# Altium PCB EEM_FMC_Carrier.PcbDoc (part 8 of 19)
Units mm, origin at the board's own origin, x right, y up, seen from the top; angles counter-clockwise.
Board outline 222.9 x 100 mm, 6 copper layers (TopLayer, MidLayer1, MidLayer2, SignalLayer1, Internal Plane 1, BottomLayer), stack 1.528 mm thick; 790 components, 743 nets, 3570 pads, 2277 vias.
Unrouted connection lines stored in the file: 3.
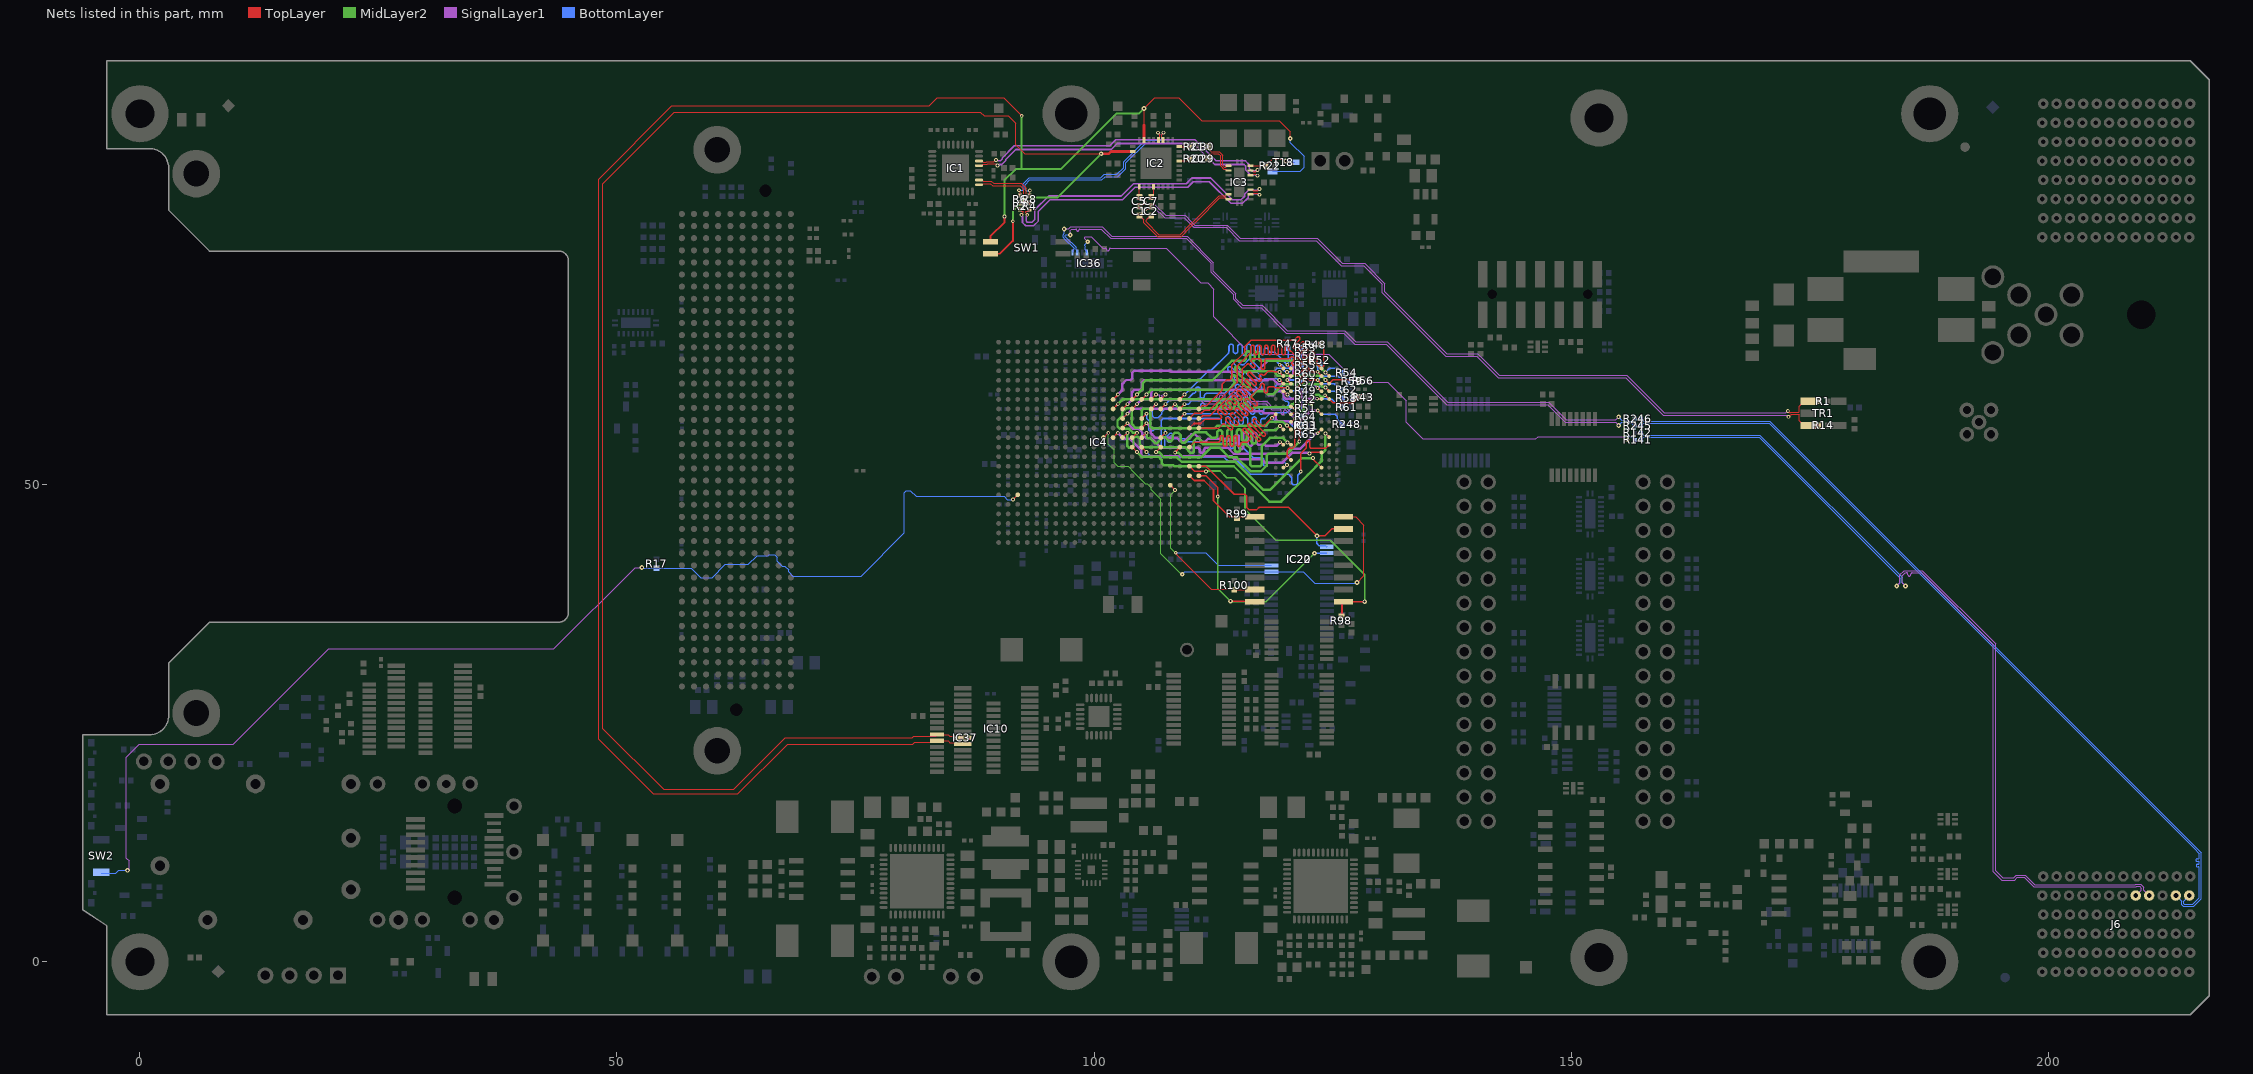
[diagram p10: the nets of this part, all layers, seen from the top]

## Via types
v1: diameter 0.4, hole 0.2, TopLayer to BottomLayer, tented both sides, 1032 vias
v2: diameter 0.5, hole 0.2, TopLayer to BottomLayer, tented both sides, 979 vias
v3: diameter 0.5, hole 0.2, TopLayer to BottomLayer, 162 vias
v4: diameter 0.8, hole 0.5, TopLayer to BottomLayer, tented both sides, 102 vias
v5: diameter 0.6, hole 0.3, TopLayer to BottomLayer, tented both sides, 2 vias

## Nets (pads, with @x,y where several pads share a name; then routed paths per layer and width w, separated by ;. In a path a pad name is that pad's centre, name@x,y a point inside that pad or via, vN(x,y) a via of type N, cw(c..) or ccw(c..) an arc to the next point about the centre after c; other vN are vias at no path point) (continued)
BP_MGT.Rx_P: IC36.15 R141.1 | length 72.5
  SignalLayer1 w0.11: v2(99.348,75.475) 99.31,75.475 99.016,75.768 99.016,75.937 99.081,76.002 99.172,76.002 99.174,76 99.7,76 100.875,74.825 100.912,74.788 101.19,74.788 cw(c101.19,74.658) 101.32,74.658 101.32,74.652 ccw(c101.45,74.652) 101.58,74.652 101.58,74.658 cw(c101.71,74.658) 101.71,74.788 101.948,74.788 107.577,74.788 111.202,71.163 111.902,71.163 112.55,70.515 112.55,67.59 116.452,63.688 124.627,63.688 127.552,60.763 130.775,60.763 132.738,58.8 132.738,56.537 134.45,54.825 146.31,54.825 146.542,55.057 155.557,55.057 v2(155.889,54.725)
  BottomLayer w0.085: IC36.15@99.248,74.35 99.248,74.525 99.166,74.607 99.154,74.607 99.104,74.657 99.104,74.969 99.004,75.069 99.004,75.14 99.34,75.475 v2(99.348,75.475) ; v2(155.889,54.725) 155.942,54.778 155.942,55.019 155.992,55.069 156.175,55.069 156.196,55.048 156.258,54.986 156.362,54.986 156.648,54.7 R141.1@156.668,54.7
BP_MGT.Tx_N: IC36.12 R246.1 | length 72.7
  SignalLayer1 w0.11: v2(96.873,76.825) 97.342,76.825 97.565,77.049 100.876,77.049 101.85,76.075 109.75,76.075 112.525,73.3 112.525,72.375 114.862,70.038 114.862,69.523 115.585,68.8 117.612,68.8 120.275,66.137 126.288,66.137 127.45,64.975 130.75,64.975 137.075,58.65 147.66,58.65 149.517,56.794 154.667,56.794 v2(154.998,57.125)
  BottomLayer w0.085: v2(96.873,76.825) 96.879,76.819 96.879,76.345 96.766,76.232 96.766,75.939 96.891,75.815 97.914,74.792 97.914,74.721 97.83,74.638 97.83,74.432 IC36.12@97.748,74.35 ; v2(154.998,57.125) 155.342,56.781 155.863,56.781 155.963,56.681 156.431,56.681 156.481,56.731 156.481,56.783 156.648,56.95 R246.1@156.668,56.95
BP_MGT.Tx_P: IC36.13 R245.1 | length 72.5
  SignalLayer1 w0.11: v2(97.509,76.189) 97.509,76.657 97.663,76.812 97.825,76.812 98.09,76.812 cw(c98.09,76.702) 98.2,76.702 98.2,76.681 ccw(c98.305,76.681) 98.305,76.576 ccw(c98.305,76.681) 98.41,76.681 98.41,76.702 cw(c98.52,76.702) 98.52,76.812 98.855,76.812 100.778,76.812 101.752,75.838 109.652,75.838 112.288,73.202 112.288,72.277 114.625,69.94 114.625,69.425 115.487,68.563 117.514,68.563 120.177,65.9 126.19,65.9 127.352,64.738 130.652,64.738 136.977,58.413 147.562,58.413 149.418,56.557 154.667,56.557 v2(154.998,56.225)
  BottomLayer w0.085: v2(97.509,76.189) 97.504,76.194 97.029,76.194 96.979,76.144 96.979,76.027 98.126,74.88 98.126,74.694 98.137,74.682 98.137,74.635 98.248,74.525 IC36.13@98.248,74.35 ; v2(154.998,56.225) 155.342,56.569 155.775,56.569 155.875,56.469 156.431,56.469 156.481,56.419 156.481,56.368 156.648,56.2 R245.1@156.668,56.2
BP_MGT_Rx_N: J6.E5 R142.2 | length 90.6
  SignalLayer1 w0.11: v2(185.048,39.4) 184.717,39.732 184.717,40.467 184.875,40.625 185.025,40.775 185.163,40.775 cw(c185.163,40.62) 185.318,40.62 185.318,40.586 ccw(c185.473,40.586) 185.473,40.431 ccw(c185.473,40.586) 185.628,40.586 185.628,40.62 cw(c185.783,40.62) 185.783,40.775 186.061,40.775 186.74,40.775 194.263,33.252 194.263,9.452 195.152,8.563 196.488,8.563 196.778,8.853 197.512,8.853 198.507,7.858 209.261,7.858 209.303,7.9 209.6,7.9 209.782,7.719 209.782,7.5 209.231,6.95 J6.E5@209.2,6.95
  BottomLayer w0.085: R142.2@157.328,55.45 157.348,55.45 157.515,55.283 157.515,55.231 157.565,55.181 157.699,55.181 157.705,55.187 ; 157.6,55.187 157.705,55.187 ; v2(185.048,39.4) 184.704,39.744 184.704,40.288 169.805,55.187 157.705,55.187
BP_MGT_Rx_P: J6.D5 R141.2 | length 90.7
  SignalLayer1 w0.11: v2(184.148,39.4) 184.48,39.731 184.48,40.565 184.927,41.012 186.061,41.012 186.838,41.012 194.5,33.35 194.5,9.55 195.25,8.8 196.39,8.8 196.68,9.09 197.61,9.09 198.605,8.095 209.163,8.095 209.205,8.137 209.698,8.137 210.019,7.817 210.019,7.5 210.569,6.95 J6.D5@210.6,6.95
  BottomLayer w0.085: R141.2@157.328,54.7 157.348,54.7 157.515,54.868 157.515,54.919 157.565,54.969 157.787,54.969 157.793,54.975 ; 157.6,54.975 157.793,54.975 ; v2(184.148,39.4) 184.492,39.744 184.492,40.2 169.717,54.975 157.793,54.975
BP_MGT_Tx_N: J6.B5 R246.2 | length 86.2
  BottomLayer w0.085: R246.2@157.328,56.95 157.348,56.95 157.515,56.783 157.515,56.725 157.565,56.675 170.85,56.675 216.087,11.438 216.087,6.612 215.275,5.8 214.187,5.8 213.994,5.993 213.994,6.356 J6.B5@213.4,6.95
BP_MGT_Tx_P: J6.A5 R245.2 | length 86.1
  BottomLayer w0.085: R245.2@157.328,56.2 157.348,56.2 157.515,56.368 157.515,56.413 157.565,56.463 170.762,56.463 194.688,32.538 213.45,13.775 215.286,11.939 ; J6.A5@214.8,6.95 214.206,6.356 214.206,6.081 214.275,6.012 215.187,6.012 215.875,6.7 215.875,9.59 215.875,9.805 ccw(c215.733,9.805) 215.733,9.947 215.677,9.947 cw(c215.677,10.09) 215.534,10.09 cw(c215.677,10.09) 215.677,10.232 215.733,10.232 ccw(c215.733,10.375) 215.875,10.375 ccw(c215.733,10.375) 215.733,10.517 215.631,10.517 cw(c215.631,10.66) 215.488,10.66 cw(c215.631,10.66) 215.631,10.802 215.733,10.802 ccw(c215.733,10.945) 215.875,10.945 215.875,11.272 215.875,11.35 215.288,11.938
BUTTON: IC4.U3 R17.1 SW2.1 | length 126
  TopLayer w0.127: v1(91.498,48.45) IC4.U3@91.998,48.95
  SignalLayer1 w0.1: v2(-1.296,9.589) -1.15,9.735 -1.15,10.575 -1.425,10.85 -1.425,21.45 -0.075,22.8 9.775,22.8 19.787,32.812 43.388,32.812 51.9,41.325 v2(52.6,41.325)
  BottomLayer w0.1: v2(52.6,41.325) 52.666,41.259 57.791,41.259 58.775,40.275 59.975,40.275 61.35,41.65 63.775,41.65 64.714,42.589 65.839,42.589 65.925,42.675 66.525,42.675 66.8,42.4 66.8,42 67.325,41.475 67.593,41.475 67.987,41.081 67.987,40.888 68.436,40.439 75.589,40.439 80.1,44.95 80.1,49.168 80.307,49.375 80.75,49.375 81.35,48.775 90.575,48.775 90.9,48.45 v1(91.498,48.45)
  BottomLayer w0.127: SW2.1@-4.05,9.275 -2.53,9.275 -2.216,9.589 v2@-1.289,9.589
CFG_CCLK: IC4.L12 IC20.9 IC22.16 | length 47.4
  TopLayer w0.1: IC22.16@126.148,46.645 127.435,46.645 128.3,45.78 128.3,40.475 v2(127.575,39.75)
  TopLayer w0.125: IC4.L12@100.998,54.95 v1(101.498,55.45)
  MidLayer2 w0.1: v1(101.498,55.45) 101.498,54.25 102.098,53.65 102.098,52.329 102.498,51.929 103.569,51.929 104.172,51.326 104.172,51.315 105.392,50.094 105.579,50.094 106,49.673 106,49.487 106.998,48.489 106.998,42.75 109.123,40.625 v2(109.248,40.625)
  BottomLayer w0.1: v2(109.248,40.625) 109.523,40.9 IC20.9@118.598,40.9 121.925,40.9 123.125,39.7 127.525,39.7 v2(127.575,39.75)
CFG_D02: IC4.P21 IC22.9 R98.1 | length 30.9
  TopLayer w0.167: IC4.P21@109.998,51.95 110.548,51.4 v1(111.723,51.4) ; R98.1@125.998,36.17 IC22.9@125.998,37.605 ; IC22.9@126.148,37.755 127.581,37.755 ; 127.586,37.761 v2@128.362,37.761
  MidLayer2 w0.167: v1(111.723,51.4) 111.768,51.445 113.203,51.445 113.917,50.731 114.747,50.731 115.825,49.653 115.825,47.425 118.05,45.2 ; 118.049,45.199 119.073,44.175 124.773,44.175 128.373,40.575 v2(128.373,37.75)
CFG_D03: IC4.R21 IC22.1 R99.1 | length 9.3
  TopLayer w0.167: IC4.R21@109.998,50.95 110.498,50.45 111.525,50.45 112.523,49.452 112.523,48.325 112.998,47.85 114.203,46.645 114.998,46.645 IC22.1@116.848,46.645
CFG_DIN_D1: IC4.R22 IC20.3 IC22.8 | length 29.8
  TopLayer w0.167: IC4.R22@110.998,50.95 111.748,50.95 112.498,50.2 112.973,49.725 v1@112.973,48.8 ; v2(114.3,37.8) 114.325,37.775 116.828,37.775 IC22.8@116.848,37.755
  MidLayer2 w0.167: v1(112.973,48.788) 112.973,47.85 112.973,39.122 114.295,37.8 v2(114.3,37.8) 114.364,37.736 114.558,37.736 114.564,37.73 118.028,37.73 v2(123.123,42.825)
  BottomLayer w0.167: v2(123.123,42.825) 124.373,42.825 IC20.3@124.398,42.85
CFG_FCS: IC4.T19 IC20.10 IC22.7 R100.1 | length 28.2
  TopLayer w0.125: IC4.T19@107.998,49.95 v1(108.498,49.45) ; v1(108.573,42.875) 108.573,42.801 108.672,42.702 108.672,42.676 112.298,39.05 114.696,39.05 R100.1@114.698,39.052 ; R100.1@114.698,38.98 114.743,39.025 IC22.7@116.848,39.025
  MidLayer2 w0.125: v1(108.498,49.45) 108.023,48.975 108.023,43.376 108.524,42.875 v1(108.573,42.875)
  BottomLayer w0.125: v1(108.573,42.875) 111.723,42.875 113.048,41.55 IC20.10@118.598,41.55
CFG_MOSI_D0: IC4.P22 IC20.2 IC22.15 | length 21.4
  TopLayer w0.16: IC4.P22@110.998,51.95 111.748,51.95 114.698,49 115.822,49 116.006,48.816 116.006,47.62 116.223,47.403 117.072,47.403 117.32,47.65 120.373,47.65 v2(123.373,44.65) 124.2,44.65 124.925,45.375 IC22.15@126.148,45.375
  BottomLayer w0.167: v2(123.373,44.65) 123.348,44.625 123.348,43.873 123.623,43.598 124.3,43.598 IC20.2@124.398,43.5
CK_MMCX_ALT_N: C2.2 IC3.18 | length 11.9
  TopLayer w0.085: C2.2@105.998,78.25 105.731,77.983 105.683,77.983 105.45,77.75 105.45,77.55 106.763,76.237 109.043,76.237 110.198,77.392 110.556,77.75 113.112,80.306 113.791,80.306 113.841,80.356 113.841,80.368 113.923,80.45 IC3.18@114.098,80.45
CK_MMCX_ALT_P: C1.2 IC3.19 | length 12.2
  TopLayer w0.085: C1.2@104.748,78.25 105.238,77.76 105.238,77.462 105.425,77.275 106.675,76.025 109.131,76.025 110.198,77.092 110.856,77.75 113.2,80.094 113.791,80.094 113.841,80.044 113.841,80.033 113.923,79.95 IC3.19@114.098,79.95
CK_MMCX_IN_N: C2.1 C7.1 R14.2 TR1.1 | length 81.9
  TopLayer w0.085: v1(105.399,78.924) 105.681,78.924 105.731,78.974 105.731,78.983 105.898,79.15 C2.1@105.998,79.15 ; v1(172.808,57.128) 172.819,57.128 173.01,57.319 173.084,57.319 173.14,57.375 173.633,57.375 173.865,57.375 173.915,57.325 173.915,56.738 174.426,56.227 TR1.1@174.871,56.227 175.986,56.227 R14.2@175.991,56.222
  SignalLayer1 w0.11: v1(105.399,78.924) 105.414,78.924 105.609,79.118 106.285,79.118 107.404,78 109.44,78 110.198,77.242 110.449,76.991 113.849,76.991 115.24,75.6 123.315,75.6 125.94,72.975 128.263,72.975 130.238,71 130.238,70.114 136.877,63.475 140.115,63.475 142.365,61.225 155.74,61.225 159.658,57.307 172.599,57.307 172.777,57.128 v1(172.808,57.128)
CK_MMCX_IN_P: C1.1 C5.1 R1.2 TR1.3 | length 82.1
  TopLayer w0.085: C1.1@104.748,79.15 104.748,79.209 105.015,79.477 105.214,79.477 105.288,79.55 v1(105.373,79.55) ; v1(172.724,57.722) 172.735,57.722 172.926,57.531 172.996,57.531 173.052,57.587 173.546,57.587 173.865,57.587 173.915,57.637 173.915,58.255 174.426,58.767 TR1.3@174.871,58.767 174.876,58.762 R1.2@175.991,58.762
  SignalLayer1 w0.11: v1(105.373,79.55) 105.388,79.55 105.582,79.355 106.383,79.355 107.502,78.237 109.538,78.237 110.198,77.577 110.547,77.228 113.947,77.228 115.338,75.837 123.413,75.837 126.038,73.212 128.361,73.212 130.475,71.098 130.475,70.212 136.975,63.712 140.213,63.712 142.463,61.462 155.838,61.462 159.756,57.544 172.515,57.544 172.693,57.722 v1(172.724,57.722)
CK_MMCX_N: C7.2 IC2.28 | length 1.2
  TopLayer w0.085: C7.2@105.998,80.15 106.248,80.4 IC2.28@106.248,81.25
CK_MMCX_P: C5.2 IC2.25 | length 1.1
  TopLayer w0.085: C5.2@104.748,80.15 IC2.25@104.748,81.25
CK_MUX_OUT0_N: IC1.2 R4.2 R8.2 | length 7.1
  TopLayer w0.1: IC1.2@87.948,81.95 88.257,81.95 88.382,81.825 89.254,81.825 89.479,81.6 92.379,81.6 92.88,81.099 92.88,79.769 92.938,79.71 93.088,79.71 93.248,79.55 R4.2@93.248,79.53
CK_MUX_OUT0_P: IC1.1 R2.2 R6.2 | length 6.7
  TopLayer w0.1: IC1.1@87.948,81.45 88.257,81.45 88.382,81.575 89.15,81.575 89.375,81.35 92.275,81.35 92.5,81.125 92.63,80.995 92.63,79.769 92.571,79.71 92.408,79.71 92.248,79.55 R2.2@92.248,79.53
CK_OSC_ALT_N: C30.2 IC3.12 | length 3.8
  TopLayer w0.085: C30.2@111.948,85.45 112.215,85.183 112.215,84.981 112.265,84.931 113.107,84.931 113.475,84.563 113.475,83.506 113.675,83.306 113.791,83.306 113.841,83.356 113.841,83.368 113.923,83.45 IC3.12@114.098,83.45
CK_OSC_ALT_P: C29.2 IC3.13 | length 3.8
  TopLayer w0.085: C29.2@111.948,84.2 112.215,84.467 112.215,84.669 112.265,84.719 113.019,84.719 113.263,84.475 113.263,83.418 113.587,83.094 113.791,83.094 113.841,83.044 113.841,83.033 113.923,82.95 IC3.13@114.098,82.95
CK_OSC_N: IC2.8 R21.2 | length 1.1
  TopLayer w0.09: IC2.8@108.948,85.45 R21.2@110.028,85.45
CK_OSC_P: IC2.5 R20.2 | length 1.2
  TopLayer w0.09: IC2.5@108.948,83.95 109.783,83.95 110.028,84.195 R20.2@110.028,84.197
CLK_MUX_ALT_OUT0_N: IC3.4 R4.1 | length 31.2
  TopLayer w0.1: v1(92.998,78.3) 92.998,78.369 92.859,78.509 92.859,78.631 92.917,78.69 93.088,78.69 93.248,78.85 R4.1@93.248,78.87 ; IC3.4@116.398,80.95 116.573,80.95 116.698,80.825 117.139,80.825 117.314,81 v1(117.348,81)
  SignalLayer1 w0.17: v1(92.998,78.3) 92.998,78.238 92.888,78.128 92.888,77.642 93.005,77.525 93.5,77.525 93.795,77.82 93.795,78.82 95.25,80.275 102.863,80.275 104.143,81.555 109.655,81.555 110.255,82.155 112.245,82.155 114.52,79.88 115.418,79.88 115.795,80.257 115.795,80.482 116.203,80.89 117.176,80.89 117.286,81 v1(117.348,81)
CLK_MUX_ALT_OUT0_P: IC3.3 R2.1 | length 31.9
  TopLayer w0.1: R2.1@92.248,78.87 92.248,78.85 92.408,78.69 92.55,78.69 92.609,78.631 92.609,78.501 92.408,78.3 v1(92.398,78.3) ; IC3.3@116.398,80.45 116.573,80.45 116.698,80.575 117.139,80.575 117.314,80.4 v1(117.348,80.4)
  SignalLayer1 w0.17: v1(92.398,78.3) 92.398,78.238 92.508,78.128 92.508,77.484 92.847,77.145 93.657,77.145 94.175,77.663 94.175,78.663 95.407,79.895 103.02,79.895 104.3,81.175 109.812,81.175 110.412,81.775 112.088,81.775 114.363,79.5 115.575,79.5 116.175,80.1 116.175,80.325 116.36,80.51 117.176,80.51 117.286,80.4 v1(117.348,80.4)
CLK_MUX_ALT_OUT1_N: IC1.6 IC3.8 | length 32.9
  TopLayer w0.1: IC1.6@87.948,83.95 88.257,83.95 88.382,83.825 88.7,83.825 88.755,83.88 89.514,83.88 89.684,84.05 v1(89.723,84.05) ; IC3.8@116.398,82.95 116.573,82.95 116.698,82.825 116.939,82.825 117.114,83 v1(117.148,83)
  SignalLayer1 w0.17: v1(89.723,84.05) 89.785,84.05 89.884,83.952 90.178,83.952 90.372,84.146 90.372,84.26 91.638,85.525 101.638,85.525 102.268,86.155 110.595,86.155 112.8,83.95 115.875,83.95 116.275,83.55 116.275,83.162 116.547,82.89 116.976,82.89 117.086,83 v1(117.148,83)
CLK_MUX_ALT_OUT1_P: IC1.5 IC3.7 | length 32.9
  TopLayer w0.1: IC1.5@87.948,83.45 88.257,83.45 88.382,83.575 88.803,83.575 88.859,83.63 89.691,83.63 89.845,83.477 v1(89.899,83.477) ; IC3.7@116.398,82.45 116.573,82.45 116.698,82.575 116.939,82.575 117.114,82.4 v1(117.148,82.4)
  SignalLayer1 w0.17: v1(89.899,83.477) 89.962,83.477 90.057,83.572 90.335,83.572 90.752,83.988 90.752,84.102 91.795,85.145 101.795,85.145 102.425,85.775 110.438,85.775 112.643,83.57 115.718,83.57 115.895,83.393 115.895,83.005 116.39,82.51 116.976,82.51 117.086,82.4 v1(117.148,82.4)
CLK_MUX_OUT0_N: IC2.11 R8.1 | length 19.9
  TopLayer w0.1: R8.1@93.248,80.28 93.248,80.819 v1(93.273,80.844) ; IC2.11@107.248,86.15 107.248,86.3 107.123,86.425 107.123,86.699 107.298,86.874 v1(107.298,86.908)
  BottomLayer w0.1: v1(93.273,80.844) 92.886,80.844 92.812,80.918 92.812,81.475 93.287,81.95 100.825,81.95 101.175,82.3 102.5,82.3 103.327,83.127 103.327,83.75 105.452,85.875 106.696,85.875 107.112,86.29 107.112,86.699 107.298,86.886 v1(107.298,86.908)
CLK_MUX_OUT0_P: IC2.12 R6.1 | length 19.9
  TopLayer w0.1: v1(92.123,80.875) 92.123,80.795 92.248,80.671 R6.1@92.248,80.28 ; v1(106.698,86.908) 106.698,86.874 106.873,86.699 106.873,86.425 106.748,86.3 IC2.12@106.748,86.15
  BottomLayer w0.1: v1(92.123,80.875) 92.139,80.859 92.526,80.859 92.585,80.918 92.585,81.569 93.192,82.177 100.731,82.177 101.081,82.527 102.406,82.527 103.1,83.221 103.1,83.844 105.358,86.102 106.602,86.102 106.885,86.385 106.885,86.699 106.698,86.886 v1(106.698,86.908)
CLK_SEL0: IC2.15 IC10.24 IC37.7 SW1.1 T18.1 | length 209.1
  TopLayer w0.125: IC10.24@86.248,22.825 85.9,22.825 85.738,22.988 84.893,22.988 84.705,23.175 IC37.7@83.55,23.175 83.388,23.013 81.188,23.013 81,22.825 67.898,22.825 62.673,17.6 53.8,17.6 48.075,23.325 48.075,82.046 55.754,89.725 82.748,89.725 83.573,90.55 90.55,90.55 v1(92.425,88.675) ; 105.248,87.73 v2(105.248,89.45) 106.374,90.576 108.872,90.576 111.273,88.175 119.398,88.175 120.573,87 v2(120.573,86.3)
  TopLayer w0.203: SW1.1@89.139,75.489 89.139,76.032 90.627,77.521 v1(90.627,78.13)
  TopLayer w0.3: IC2.15@105.248,86.15 105.248,86.3 105.248,87.73
  MidLayer2 w0.203: v1(90.627,78.13) 90.602,78.156 90.602,81.902 91.825,83.125 92.4,83.125 ; v1(92.425,88.675) 92.4,88.65 92.4,83.125 ; v2(105.248,89.45) 104.698,88.9 102.34,88.9 96.565,83.125 92.4,83.125
  BottomLayer w0.125: T18.1@118.723,82.85 121.598,82.85 122.023,83.275 122.023,84.425 120.573,85.875 v2(120.573,86.3)
CLK_SEL0_N: IC3.9 R22.1 T18.3 | length 5.1
  TopLayer w0.125: IC3.9@116.398,83.45 R22.1@118.003,83.45 118.678,84.125 119.812,84.125 119.987,83.95 v2(120.073,83.95)
  BottomLayer w0.125: v2(120.073,83.95) 120.123,84 120.623,84 120.823,83.8 T18.3@121.023,83.8
CLK_SEL1: IC2.18 IC10.23 IC37.6 SW1.2 | length 179.6
  TopLayer w0.125: IC10.23@86.248,23.475 86.05,23.475 85.888,23.638 84.893,23.638 84.705,23.825 IC37.6@83.55,23.825 83.388,23.663 81.112,23.663 80.925,23.475 67.629,23.475 62.229,18.075 54.9,18.075 48.525,24.45 48.525,81.577 56.023,89.075 88.098,89.075 88.473,88.7 90.998,88.7 91.823,87.875 91.823,85.625 92.748,84.7 v2(100.748,84.7)
  TopLayer w0.203: SW1.2@89.139,74.219 90.145,74.219 91.491,75.565 v1(91.491,77.622)
  TopLayer w0.3: v2(100.748,84.7) 101.528,84.7 ; 101.571,84.732 101.789,84.95 IC2.18@104.048,84.95
  MidLayer2 w0.203: v1(91.491,77.622) 91.516,77.648 91.516,78.725 92.891,80.1 96.148,80.1 v2(100.748,84.7)
DDR3_A0: IC4.H14 IC11.N3 R62.1 | length 26.5
  TopLayer w0.16: IC4.H14@102.998,57.95 v1(103.498,58.45) ; v1(123.444,60.138) 123.477,60.138 123.815,59.8 IC11.N3@123.848,59.8
  SignalLayer1 w0.26: v1(103.498,58.45) 103.962,58.914 103.962,59.69 104.216,59.944 104.847,59.944 105.004,60.101 105.004,60.706 105.232,60.935 118.186,60.935 118.313,61.062 118.77,61.062 119.278,60.554 120.121,60.554 120.125,60.557 123.025,60.557 v1(123.444,60.138)
  BottomLayer w0.16: v1(123.444,60.138) 123.507,60.138 123.653,60.283 123.656,60.283 123.973,60.6 125.176,60.6 125.617,60.159 125.821,60.159 126.028,59.952 R62.1@126.028,59.95
DDR3_A1: IC4.G13 IC11.P7 R60.1 | length 25.9
  TopLayer w0.16: IC4.G13@101.998,58.95 v1(102.498,59.45) ; v1@120.263,60.985 IC11.P7@120.648,60.6
  SignalLayer1 w0.26: v1(102.498,59.45) 102.972,59.924 102.972,60.579 103.378,60.985 103.856,60.985 104.013,61.142 104.013,61.773 104.216,61.976 107.987,61.976 108.097,61.865 117.059,61.865 118.288,63.094 120.447,63.094 120.904,62.636 120.904,61.638 v1@120.269,61.003
  BottomLayer w0.16: v1(120.251,60.985) 121.083,60.985 121.728,61.63 R60.1@121.728,61.65
DDR3_A2: IC4.J22 IC11.P3 R59.1 | length 30.5
  TopLayer w0.16: IC4.J22@110.998,56.95 111.09,56.95 111.39,57.25 112.15,57.25 115.525,60.625 115.525,62.125 115.712,62.312 116.024,62.624 cw(c116.151,62.496) 116.278,62.624 116.575,62.326 ccw(c116.703,62.454) 116.83,62.326 ccw(c116.703,62.454) 116.83,62.581 116.533,62.878 cw(c116.66,63.005) 116.533,63.133 116.6,63.2 116.875,63.2 116.925,63.2 117.365,63.2 cw(c117.365,63.02) 117.545,63.02 117.545,62.262 ccw(c117.725,62.262) 117.905,62.262 117.905,63.02 cw(c118.085,63.02) 118.085,63.2 118.55,63.2 120.177,63.2 120.29,63.2 ccw(c120.29,63.593) 120.568,63.315 120.622,63.369 cw(c120.784,63.206) 120.947,63.369 cw(c120.784,63.206) 120.947,63.043 120.799,62.896 ccw(c120.962,62.733) 120.799,62.57 ccw(c120.962,62.733) 121.125,62.57 121.272,62.718 cw(c121.435,62.555) 121.598,62.718 cw(c121.435,62.555) 121.598,62.393 121.05,61.845 ccw(c121.212,61.682) 121.05,61.52 ccw(c121.212,61.682) 121.375,61.52 121.923,62.068 cw(c122.085,61.905) 122.248,62.068 cw(c122.085,61.905) 122.248,61.742 121.18,60.674 ccw(c121.342,60.511) 121.18,60.348 ccw(c121.342,60.511) 121.505,60.348 122.203,61.047 cw(c122.366,60.884) 122.528,61.047 122.59,60.985 123.414,60.985 v1(123.451,60.985) 123.457,60.985 123.842,60.6 IC11.P3@123.848,60.6
  BottomLayer w0.16: v1(123.451,60.985) 123.841,61.375 125.559,61.375 125.667,61.268 126.16,61.268 126.351,61.077 126.371,61.077 126.578,60.87 R59.1@126.578,60.85
DDR3_A3: IC4.H13 IC11.N2 R58.1 | length 26.6
  TopLayer w0.16: IC4.H13@101.998,57.95 v1(102.498,58.45) ; v1(124.251,60.185) 124.263,60.185 IC11.N2@124.648,59.8
  MidLayer2 w0.26: v1(102.498,58.45) 103.023,58.975 116.193,58.975 117.028,59.81 117.903,59.81 118.236,59.477 118.761,59.477 119.837,60.554 120.121,60.554 120.125,60.557 120.464,60.557 120.468,60.554 123.649,60.554 123.903,60.3 124.101,60.3 124.216,60.185 v1(124.251,60.185)
  BottomLayer w0.16: v1(124.251,60.185) 124.637,59.8 125.278,59.8 125.801,59.277 125.821,59.277 126.028,59.07 R58.1@126.028,59.05
DDR3_A4: IC4.H17 IC11.P8 R57.1 | length 25.6
  TopLayer w0.16: IC4.H17@105.998,57.95 v1(106.498,58.45) ; v1@119.463,60.985 IC11.P8@119.848,60.6
  BottomLayer w0.16: v1(106.498,58.45) 106.098,58.05 106.098,57.25 106.298,57.05 106.723,57.05 107.123,57.45 107.123,57.625 107.498,58 110.302,58 110.94,58 ccw(c110.94,58.23) 111.17,58.23 111.17,58.318 cw(c111.4,58.318) 111.63,58.318 111.63,58.23 ccw(c111.86,58.23) 111.86,58 112.4,58 114.327,58 114.398,58 115.008,58.61 ccw(c114.846,58.773) 115.008,58.936 114.987,58.957 cw(c115.15,59.12) 114.987,59.282 cw(c115.15,59.12) 115.312,59.282 115.522,59.072 ccw(c115.685,59.235) 115.847,59.072 ccw(c115.685,59.235) 115.847,59.398 115.637,59.608 cw(c115.8,59.77) 115.637,59.933 cw(c115.8,59.77) 115.963,59.933 116.423,59.472 ccw(c116.586,59.635) 116.749,59.472 ccw(c116.586,59.635) 116.749,59.798 116.288,60.258 cw(c116.451,60.421) 116.288,60.583 cw(c116.451,60.421) 116.613,60.583 117.189,60.007 ccw(c117.352,60.17) 117.515,60.007 ccw(c117.352,60.17) 117.515,60.333 117.51,60.337 cw(c117.673,60.5) 117.51,60.662 117.567,60.719 117.701,60.853 117.701,60.946 117.867,61.112 118.434,61.112 118.444,61.103 119.19,61.103 119.262,61.03 119.407,61.03 v1(119.451,60.985) 119.869,60.567 121.545,60.567 R57.1@121.728,60.75
DDR3_A5: IC4.G16 IC11.P2 R56.1 | length 30.3
  TopLayer w0.16: IC4.G16@104.998,58.95 v1(105.498,59.45) ; v1@124.263,60.985 IC11.P2@124.648,60.6 125.059,61.011 127.617,61.011 R56.1@127.728,60.9
  MidLayer2 w0.26: v1(105.498,59.45) 105.998,59.95 114.073,59.95 114.561,60.438 114.653,60.53 ccw(c114.47,60.714) 114.653,60.898 114.462,61.09 cw(c114.625,61.252) 114.462,61.415 cw(c114.625,61.252) 114.787,61.415 ; 114.787,61.415 115.931,60.271 ccw(c116.093,60.434) 116.256,60.271 ccw(c116.093,60.434) 116.256,60.597 114.851,62.002 cw(c115.013,62.164) 114.851,62.327 cw(c115.013,62.164) 115.176,62.327 115.629,61.874 ccw(c115.813,62.058) 115.997,61.874 116.008,61.885 116.565,61.885 117.157,61.885 117.182,61.91 118.811,61.91 119.066,61.654 119.066,61.634 119.286,61.414 123.872,61.414 124.185,61.101 124.185,61.087 124.251,61.021 v1(124.251,60.985)
DDR3_A6: IC4.K21 IC11.R8 R55.1 | length 30.2
  TopLayer w0.16: IC4.K21@109.998,55.95 110.473,56.425 111.175,56.425 111.625,56.875 113.038,56.875 113.225,56.875 113.316,56.966 ccw(c113.188,57.093) 113.316,57.22 113.021,57.515 cw(c113.148,57.642) 113.021,57.769 cw(c113.148,57.642) 113.276,57.769 113.645,57.4 ccw(c113.772,57.527) 113.899,57.4 ccw(c113.772,57.527) 113.899,57.654 113.53,58.024 cw(c113.657,58.151) 113.53,58.278 cw(c113.657,58.151) 113.785,58.278 114.154,57.909 ccw(c114.281,58.036) 114.409,57.909 ccw(c114.281,58.036) 114.409,58.163 114.039,58.533 cw(c114.167,58.66) 114.039,58.787 cw(c114.167,58.66) 114.294,58.787 114.663,58.418 ccw(c114.79,58.545) 114.918,58.418 ccw(c114.79,58.545) 114.918,58.673 ; 114.918,58.673 114.548,59.042 cw(c114.676,59.169) 114.548,59.296 cw(c114.676,59.169) 114.803,59.296 115.172,58.927 ccw(c115.3,59.054) 115.427,58.927 ccw(c115.3,59.054) 115.427,59.182 115.058,59.551 cw(c115.185,59.678) 115.058,59.806 cw(c115.185,59.678) 115.312,59.806 115.723,59.395 ccw(c115.85,59.522) 115.977,59.395 ccw(c115.85,59.522) 115.977,59.65 115.567,60.06 cw(c115.694,60.187) 115.567,60.315 cw(c115.694,60.187) 115.821,60.315 116.232,59.904 ccw(c116.359,60.031) 116.486,59.904 ccw(c116.359,60.031) 116.486,60.159 115.901,60.744 cw(c116.028,60.871) 115.901,60.998 cw(c116.028,60.871) 116.156,60.998 116.709,60.445 ccw(c116.837,60.572) 116.964,60.445 ccw(c116.837,60.572) 116.964,60.699 116.168,61.495 cw(c116.295,61.622) 116.168,61.75 cw(c116.295,61.622) 116.423,61.75 117.25,60.922 ccw(c117.377,61.05) 117.505,60.922 ccw(c117.377,61.05) 117.505,61.177 117.386,61.296 cw(c117.513,61.423) 117.386,61.55 cw(c117.513,61.423) 117.64,61.55 117.643,61.548 ccw(c117.77,61.675) 117.898,61.548 118.275,61.925 118.334,61.925 118.776,61.925 118.87,61.831 119.449,61.831 v1(119.456,61.824) 119.456,61.808 119.848,61.416 IC11.R8@119.848,61.4
  BottomLayer w0.16: R55.1@121.728,62.53 120.611,61.413 119.867,61.413 ; 119.867,61.413 119.824,61.413 119.456,61.781 v1(119.456,61.824) 119.867,61.413
DDR3_A7: IC4.G15 IC11.R2 R54.1 | length 28.6
  TopLayer w0.16: IC4.G15@103.998,58.95 v1(104.498,59.45) ; v1(124.251,61.785) 124.263,61.785 IC11.R2@124.648,61.4
  MidLayer2 w0.26: v1(104.498,59.45) 105.088,60.04 105.088,60.62 105.418,60.95 112.398,60.95 114.443,62.995 115.525,62.995 115.655,62.995 ccw(c115.655,63.255) 115.915,63.255 115.915,63.772 cw(c116.145,63.772) 116.375,63.772 116.375,63.214 ccw(c116.605,63.214) 116.835,63.214 116.835,63.702 cw(c117.065,63.702) 117.295,63.702 117.295,63.255 ccw(c117.555,63.255) 117.555,62.995 118.008,62.995 123.041,62.995 v1(124.251,61.785)
  BottomLayer w0.16: v1(124.251,61.785) 124.666,62.2 125.578,62.2 125.801,61.977 125.821,61.977 126.028,61.77 R54.1@126.028,61.75
DDR3_A8: IC4.H18 IC11.T8 R53.1 | length 26.1
  TopLayer w0.16: IC4.H18@106.998,57.95 v1(107.498,58.45) ; v1(119.463,62.585) IC11.T8@119.848,62.2
  BottomLayer w0.16: v1(107.498,58.45) 107.998,58.95 109.748,58.95 110.35,59.552 110.373,59.575 110.43,59.575 ccw(c110.43,59.805) 110.66,59.805 110.66,60.025 cw(c110.89,60.025) 111.12,60.025 111.12,59.321 ccw(c111.35,59.321) 111.58,59.321 111.58,59.345 cw(c111.81,59.345) 111.81,59.575 112.492,59.575 113.648,59.575 114.202,60.129 114.711,60.638 114.711,61.264 ccw(c114.481,61.264) 114.643,61.426 114.082,61.987 cw(c114.245,62.15) 114.082,62.313 cw(c114.245,62.15) 114.407,62.313 115.251,61.469 ccw(c115.414,61.632) 115.576,61.469 ccw(c115.414,61.632) 115.576,61.794 114.733,62.638 cw(c114.895,62.801) 114.733,62.963 cw(c114.895,62.801) 115.058,62.963 115.397,62.624 ccw(c115.56,62.787) 115.722,62.624 116.223,63.125 116.273,63.175 118.873,63.175 v1(119.463,62.585) ; v1@119.477,62.571 119.75,62.571 120.108,62.213 120.417,62.213 120.748,62.544 120.748,63.35 R53.1@121.728,64.33
DDR3_A9: IC4.J21 IC11.R3 R52.1 | length 29
  TopLayer w0.16: IC4.J21@109.998,56.95 110.548,57.5 111.25,57.5 111.55,57.8 112.075,57.8 115,60.725 115,62.425 116.275,63.7 116.355,63.78 ccw(c116.138,63.997) 116.445,63.997 116.445,64.447 cw(c116.625,64.447) 116.805,64.447 116.805,63.829 ccw(c116.985,63.829) 117.165,63.829 117.165,64.447 cw(c117.345,64.447) 117.525,64.447 117.525,63.829 ccw(c117.705,63.829) 117.885,63.829 117.885,64.447 cw(c118.065,64.447) 118.245,64.447 118.245,63.829 ccw(c118.425,63.829) 118.605,63.829 118.605,64.447 cw(c118.785,64.447) 118.965,64.447 118.965,63.829 ccw(c119.145,63.829) 119.325,63.829 119.325,64.447 cw(c119.505,64.447) 119.685,64.447 119.685,63.829 ccw(c119.865,63.829) 120.045,63.829 120.045,64.447 cw(c120.225,64.447) 120.405,64.447 120.405,64.205 ccw(c120.585,64.205) 120.585,64.025 120.643,64.025 120.972,63.695 122.819,61.849 v1(123.444,61.849) 123.444,61.827 123.848,61.422 IC11.R3@123.848,61.4
  BottomLayer w0.16: v1(123.444,61.849) 123.444,62.376 R52.1@123.648,62.58
DDR3_A10: IC4.J16 IC11.L7 R51.1 | length 26.4
  TopLayer w0.16: IC4.J16@104.998,56.95 v1(105.498,57.45) ; IC11.L7@120.648,58.2 120.711,58.2 120.841,58.07 121.008,58.07 v1(121.052,58.025)
  BottomLayer w0.16: v1(105.498,57.45) 105.525,57.424 105.525,56.956 105.923,56.558 105.923,56.3 105.723,56.1 105.723,55.752 105.825,55.65 106.171,55.65 106.344,55.822 106.77,55.822 107.073,56.125 107.073,56.775 107.248,56.95 112.575,56.95 113.115,56.95 cw(c113.115,56.72) 113.345,56.72 113.345,56.542 ccw(c113.575,56.542) 113.805,56.542 113.805,56.894 cw(c114.035,56.894) 114.265,56.894 114.265,56.542 ccw(c114.495,56.542) 114.725,56.542 114.725,56.894 cw(c114.955,56.894) 115.185,56.894 115.185,56.542 ccw(c115.415,56.542) 115.645,56.542 115.645,56.894 cw(c115.875,56.894) 116.105,56.894 116.105,56.542 ccw(c116.335,56.542) 116.565,56.542 116.565,56.894 cw(c116.795,56.894) 117.025,56.894 117.025,56.542 ccw(c117.255,56.542) 117.485,56.542 117.485,56.72 cw(c117.715,56.72) 117.715,56.95 117.923,56.95 118.176,57.203 118.504,57.531 120.181,57.531 120.693,58.043 121.035,58.043 v1(121.052,58.025) 121.703,58.025 R51.1@121.728,58.05
DDR3_A11: IC4.H20 IC11.R7 R50.1 | length 23
  TopLayer w0.16: IC4.H20@108.998,57.95 v1(109.498,58.45) ; v1(120.244,61.841) 120.244,61.823 120.648,61.418 IC11.R7@120.648,61.4
  BottomLayer w0.16: v1(109.498,58.45) 109.9,58.45 110.275,58.825 113.975,58.825 114.212,59.062 114.269,59.119 ccw(c114.106,59.282) 114.269,59.444 114.232,59.482 cw(c114.394,59.644) 114.232,59.807 cw(c114.394,59.644) 114.557,59.807 114.659,59.705 ccw(c114.822,59.867) 114.984,59.705 ccw(c114.822,59.867) 114.984,60.03 114.882,60.132 cw(c115.045,60.295) 114.882,60.457 cw(c115.045,60.295) 115.208,60.457 115.31,60.355 ccw(c115.473,60.518) 115.635,60.355 ccw(c115.473,60.518) 115.635,60.68 115.549,60.767 cw(c115.712,60.929) 115.549,61.092 cw(c115.712,60.929) 115.874,61.092 115.977,60.989 ccw(c116.14,61.151) 116.303,60.989 ccw(c116.14,61.151) 116.303,61.314 116.055,61.562 cw(c116.218,61.724) 116.055,61.887 cw(c116.218,61.724) 116.38,61.887 117.08,61.187 ccw(c117.243,61.35) 117.405,61.187 ccw(c117.243,61.35) 117.405,61.513 116.48,62.438 cw(c116.642,62.601) 116.48,62.763 cw(c116.642,62.601) 116.805,62.763 117.551,62.017 ccw(c117.714,62.18) 117.714,61.95 118.45,61.95 118.923,61.95 119.178,62.205 119.659,62.205 119.982,61.882 120.203,61.882 v1(120.244,61.841) ; v1@120.275,61.868 120.541,61.868 121.158,62.485 121.158,62.86 R50.1@121.728,63.43
DDR3_A12: IC4.K22 IC11.N7 R49.1 | length 28.3
  TopLayer w0.16: IC4.K22@110.998,55.95 113.1,55.95 113.162,56.012 113.474,56.324 cw(c113.601,56.196) 113.728,56.324 114.222,55.83 ccw(c114.35,55.957) 114.477,55.83 ccw(c114.35,55.957) 114.477,56.084 113.848,56.713 cw(c113.975,56.84) 113.848,56.967 cw(c113.975,56.84) 114.103,56.967 114.791,56.279 ccw(c114.918,56.406) 115.046,56.279 ccw(c114.918,56.406) 115.046,56.533 114.357,57.222 cw(c114.484,57.349) 114.357,57.477 cw(c114.484,57.349) 114.612,57.477 115.3,56.788 ccw(c115.428,56.915) 115.555,56.788 ccw(c115.428,56.915) 115.555,57.043 114.866,57.731 cw(c114.994,57.858) 114.866,57.986 cw(c114.994,57.858) 115.121,57.986 115.809,57.297 ccw(c115.937,57.424) 116.064,57.297 ccw(c115.937,57.424) 116.064,57.552 115.375,58.24 cw(c115.503,58.368) 115.375,58.495 cw(c115.503,58.368) 115.63,58.495 116.319,57.806 ccw(c116.446,57.934) 116.573,57.806 ccw(c116.446,57.934) 116.573,58.061 115.889,58.745 cw(c116.016,58.872) 115.889,58.999 cw(c116.016,58.872) 116.144,58.999 116.828,58.315 ccw(c116.955,58.443) 117.082,58.315 ccw(c116.955,58.443) 117.082,58.57 116.528,59.124 cw(c116.656,59.251) 116.528,59.378 116.775,59.625 117.3,60.15 117.38,60.23 ccw(c117.163,60.447) 117.47,60.447 cw(c117.65,60.447) 117.83,60.447 117.83,59.82 ccw(c118.01,59.82) 118.19,59.82 118.19,60.076 cw(c118.37,60.076) 118.37,60.256 118.795,60.256 118.87,60.256 118.957,60.169 120.273,60.169 v1(120.294,60.147) 120.642,59.8 IC11.N7@120.648,59.8
  BottomLayer w0.16: v1(120.294,60.147) 120.592,59.85 R49.1@121.728,59.85
DDR3_A13: IC4.H22 IC11.T3 R48.1 | length 29.8
  TopLayer w0.16: IC4.H22@110.998,57.95 111.348,58.3 111.825,58.3 113.45,59.925 113.45,60.576 113.874,61 114.236,61 114.45,61.214 114.45,62.55 115.825,63.925 115.825,64.525 116.475,65.175 120.75,65.175 120.863,65.175 ccw(c120.863,65.482) 121.08,65.264 121.281,65.465 cw(c121.408,65.338) 121.535,65.465 cw(c121.408,65.338) 121.535,65.211 120.913,64.588 ccw(c121.04,64.461) 120.913,64.333 ccw(c121.04,64.461) 121.167,64.333 121.79,64.956 cw(c121.917,64.829) 122.044,64.956 cw(c121.917,64.829) 122.044,64.702 121.422,64.079 ccw(c121.549,63.952) 121.422,63.824 ccw(c121.549,63.952) 121.676,63.824 122.118,64.266 cw(c122.246,64.139) 122.373,64.266 cw(c122.246,64.139) 122.373,64.012 121.931,63.57 ccw(c122.058,63.442) 121.931,63.315 ccw(c122.058,63.442) 122.185,63.315 122.808,63.938 cw(c122.935,63.811) 123.063,63.938 cw(c122.935,63.811) 123.063,63.683 122.491,63.112 ccw(c122.619,62.985) 122.491,62.858 ccw(c122.619,62.985) 122.746,62.858 123.095,63.207 cw(c123.223,63.08) 123.35,63.207 cw(c123.223,63.08) 123.35,62.953 ccw(c123.477,62.825) 123.35,62.698 123.561,62.487 123.617,62.431 IC11.T3@123.848,62.2 124.1,62.452 124.1,64.318 123.948,64.47 123.928,64.47 123.718,64.68 R48.1@123.718,64.7
DDR3_A14: IC4.G20 IC11.T7 R47.1 | length 23.9
  TopLayer w0.16: IC4.G20@108.998,58.95 v1(109.498,59.45) ; v1(120.263,62.585) IC11.T7@120.648,62.2
  BottomLayer w0.16: v1(109.498,59.45) 111.816,61.768 111.816,61.831 111.984,62 112.298,62 113.955,63.657 114.036,63.738 ; 114.037,63.739 ccw(c113.758,64.015) 114.15,64.015 114.15,64.508 cw(c114.38,64.508) 114.61,64.508 114.61,63.994 ccw(c114.84,63.994) 115.07,63.994 115.07,64.508 cw(c115.3,64.508) 115.53,64.508 115.53,63.796 ccw(c115.76,63.796) 115.99,63.796 115.99,64.508 cw(c116.22,64.508) 116.45,64.508 116.45,63.796 ccw(c116.68,63.796) 116.91,63.796 116.91,64.383 cw(c117.14,64.383) 117.37,64.383 117.37,63.875 ccw(c117.6,63.875) 117.83,63.875 117.83,64.105 cw(c118.06,64.105) 118.29,64.105 ccw(c118.52,64.105) 118.52,63.875 118.925,63.875 118.973,63.875 119.618,63.23 v1(120.263,62.585) 120.263,62.65 120.367,62.755 120.367,64.261 R47.1@120.298,64.33
DDR3_BA0: IC4.H19 IC11.M2 R43.1 | length 27.7
  TopLayer w0.16: IC4.H19@107.998,57.95 v1(108.498,58.45) ; v1(124.231,59.385) 124.247,59.385 124.632,59 IC11.M2@124.648,59 125.048,58.6 127.178,58.6 127.551,58.973 127.571,58.973 127.778,59.18 R43.1@127.778,59.2
  MidLayer2 w0.26: v1(108.498,58.45) 108.923,58.025 110.651,58.025 110.661,58.035 111.209,58.035 111.219,58.025 112.5,58.025 112.63,58.025 ccw(c112.63,58.285) 112.89,58.285 112.89,58.392 cw(c113.12,58.392) 113.35,58.392 113.35,58.219 ccw(c113.58,58.219) 113.81,58.219 113.81,58.392 cw(c114.04,58.392) 114.27,58.392 114.27,58.219 ccw(c114.5,58.219) 114.73,58.219 114.73,58.392 cw(c114.96,58.392) 115.19,58.392 115.19,58.219 ccw(c115.42,58.219) 115.65,58.219 115.65,58.392 cw(c115.88,58.392) 116.11,58.392 116.11,58.285 ccw(c116.37,58.285) 116.37,58.025 116.698,58.025 116.823,58.15 117.416,58.15 120.448,58.15 120.7,58.402 120.743,58.445 120.83,58.445 ccw(c120.83,58.705) 121.09,58.705 121.09,59.061 cw(c121.32,59.061) 121.55,59.061 121.55,58.007 ccw(c121.78,58.007) 122.01,58.007 122.01,58.185 cw(c122.27,58.185) 122.27,58.445 122.826,58.445 122.973,58.592 122.975,58.594 122.975,59.191 123.223,59.44 123.563,59.44 123.786,59.216 124.026,59.216 124.196,59.385 v1(124.231,59.385)
DDR3_BA1: IC4.J20 IC11.N8 R42.1 | length 22.9
  TopLayer w0.16: IC4.J20@108.998,56.95 v1(109.498,57.45) ; IC11.N8@119.848,59.8 119.867,59.8 120.205,59.461 v1(120.294,59.461)
  BottomLayer w0.16: v1(109.498,57.45) 114.673,57.45 114.814,57.591 115.077,57.854 cw(c115.239,57.691) 115.469,57.691 115.469,57.631 ccw(c115.699,57.631) 115.929,57.631 115.929,58.461 cw(c116.159,58.461) 116.389,58.461 116.389,57.631 ccw(c116.619,57.631) 116.849,57.631 116.849,57.866 cw(c117.079,57.866) 117.309,57.866 117.309,57.631 ccw(c117.539,57.631) 117.769,57.631 117.769,57.82 cw(c117.999,57.82) 117.999,58.05 119.888,58.05 120.073,58.05 120.423,58.4 120.423,58.6 120.248,58.775 120.032,58.775 119.824,58.984 119.824,59.536 119.602,59.758 119.29,59.758 119.023,60.025 119.023,60.375 119.173,60.525 119.498,60.525 119.879,60.144 119.879,59.877 v1(120.294,59.461) 120.806,58.95 R42.1@121.728,58.95
DDR3_BA2: IC4.H15 IC11.M3 R61.1 | length 27.7
  TopLayer w0.16: IC4.H15@103.998,57.95 v1(104.498,58.45) ; v1(123.393,59.03) 123.408,59.015 123.833,59.015 IC11.M3@123.848,59
  SignalLayer1 w0.26: v1(104.498,58.45) 105.001,58.953 105.791,58.953 105.994,59.157 105.994,59.741 106.223,59.969 117.754,59.969 118.339,59.385 118.745,59.385 119.202,59.842 119.609,59.842 119.863,59.588 119.863,59.256 120.089,59.03 120.75,59.03 120.88,59.03 ccw(c120.88,59.31) 121.16,59.31 121.16,59.707 cw(c121.44,59.707) 121.72,59.707 121.72,58.566 ccw(c122,58.566) 122.28,58.566 122.28,58.75 cw(c122.56,58.75) 122.56,59.03 123.075,59.03 v1(123.393,59.03)
  BottomLayer w0.16: v1(123.393,59.03) 123.41,59.013 124.35,59.013 124.413,58.95 124.973,58.95 125.59,58.333 125.845,58.333 R61.1@126.028,58.15
DDR3_CAS_N: IC4.J14 IC11.K3 R248.1 | length 26.3
  TopLayer w0.16: IC4.J14@102.998,56.95 v1(103.498,57.45) ; v1@123.463,57.785 IC11.K3@123.848,57.4
  SignalLayer1 w0.26: v1(103.498,57.45) 104.023,57.975 116.048,57.975 116.338,57.685 117.658,57.685 117.838,57.506 118.915,57.506 119.072,57.349 119.072,56.874 119.293,56.653 119.765,56.653 119.766,56.655 120.536,56.655 120.777,56.413 121.361,56.413 122.733,57.785 v1(123.451,57.785)
  BottomLayer w0.16: v1(123.451,57.785) 123.837,57.4 125.248,57.4 125.498,57.15 125.498,56.88 125.801,56.577 125.821,56.577 126.028,56.37 R248.1@126.028,56.35
DDR3_CK_N: IC4.G18 IC11.K7 R64.2 | length 22.1
  TopLayer w0.085: IC4.G18@106.998,58.95 v1(107.498,59.45) ; IC11.K7@120.648,57.4 120.733,57.4 120.876,57.543 121.198,57.543 v1(121.204,57.549)
  SignalLayer1 w0.11: v1(107.498,59.45) 107.181,59.45 107.117,59.386 107.117,59.294 107.326,59.085 111.265,59.085 111.613,58.737 112.5,58.737 112.674,58.737 ccw(c112.674,58.942) 112.879,58.942 112.879,59.195 cw(c113.321,59.195) 113.321,59.637 cw(c113.321,59.195) 113.763,59.195 113.763,58.718 ccw(c113.968,58.718) 113.968,58.513 ccw(c113.968,58.718) 114.173,58.718 114.173,59.195 cw(c114.615,59.195) 114.615,59.637 cw(c114.615,59.195) 115.056,59.195 115.056,58.718 ccw(c115.261,58.718) 115.261,58.513 ccw(c115.261,58.718) 115.466,58.718 115.466,59.195 cw(c115.908,59.195) 115.908,59.637 cw(c115.908,59.195) 116.35,59.195 116.35,58.942 ccw(c116.555,58.942) 116.555,58.737 117.069,58.737 117.997,58.737 118,58.734 118.091,58.734 118.725,58.1 120.137,58.1 120.869,57.368 120.995,57.368 121.176,57.549 v1(121.204,57.549)
  BottomLayer w0.085: v1(121.204,57.549) 121.264,57.489 121.409,57.489 121.728,57.17 R64.2@121.728,57.15
DDR3_CK_P: IC4.G17 IC11.J7 R63.2 | length 23.4
  TopLayer w0.085: IC4.G17@105.998,58.95 v1(106.498,59.45) ; IC11.J7@120.648,56.6 120.711,56.6 121.06,56.95 v1(121.123,56.95)
  SignalLayer1 w0.11: v1(106.498,59.45) 106.815,59.45 106.88,59.386 106.88,59.196 107.228,58.848 111.167,58.848 111.515,58.5 112.5,58.5 112.674,58.5 ccw(c112.674,58.942) 113.116,58.942 113.116,59.195 cw(c113.321,59.195) 113.321,59.4 cw(c113.321,59.195) 113.526,59.195 113.526,58.718 ccw(c113.968,58.718) 113.968,58.276 ccw(c113.968,58.718) 114.41,58.718 114.41,59.195 cw(c114.615,59.195) 114.615,59.4 cw(c114.615,59.195) 114.82,59.195 114.82,58.718 ccw(c115.261,58.718) 115.261,58.276 ccw(c115.261,58.718) 115.703,58.718 115.703,59.195 cw(c115.908,59.195) 115.908,59.4 cw(c115.908,59.195) 116.113,59.195 116.113,58.942 ccw(c116.555,58.942) 116.555,58.5 117.069,58.5 117.689,58.5 117.692,58.497 117.993,58.497 118.627,57.863 119.2,57.863 119.515,57.863 cw(c119.515,57.733) 119.645,57.733 119.645,57.508 ccw(c119.775,57.508) 119.905,57.508 119.905,57.733 cw(c120.035,57.733) 120.035,57.863 120.039,57.863 120.625,57.277 120.771,57.131 120.914,57.131 121.094,56.95 v1(121.123,56.95)
  BottomLayer w0.085: v1(121.123,56.95) 121.123,56.875 121.728,56.27 R63.2@121.728,56.25
DDR3_CKE: IC4.M21 IC11.K9 R65.2 | length 30.1
  TopLayer w0.16: IC4.M21@109.998,53.95 110.523,54.475 112.95,54.475 113.03,54.475 ccw(c113.03,54.655) 113.21,54.655 113.21,54.979 cw(c113.39,54.979) 113.57,54.979 113.57,54.209 ccw(c113.75,54.209) 113.93,54.209 113.93,54.979 cw(c114.11,54.979) 114.29,54.979 114.29,54.209 ccw(c114.47,54.209) 114.65,54.209 114.65,54.979 cw(c114.83,54.979) 115.01,54.979 115.01,54.209 ccw(c115.19,54.209) 115.37,54.209 115.37,54.295 cw(c115.55,54.295) 115.55,54.475 116.114,54.475 116.15,54.511 116.277,54.639 116.334,54.695 ccw(c116.207,54.823) 116.334,54.95 115.658,55.625 cw(c115.786,55.753) 115.658,55.88 cw(c115.786,55.753) 115.913,55.88 117.159,54.634 ccw(c117.286,54.761) 117.414,54.634 ccw(c117.286,54.761) 117.414,54.888 116.167,56.135 cw(c116.295,56.262) 116.167,56.389 cw(c116.295,56.262) 116.422,56.389 117.668,55.143 ccw(c117.795,55.27) 117.923,55.143 ccw(c117.795,55.27) 117.923,55.397 116.719,56.601 cw(c116.846,56.729) 116.719,56.856 cw(c116.846,56.729) 116.973,56.856 117.607,56.223 ccw(c117.734,56.35) 117.861,56.223 118.244,56.606 v1(118.662,57.023) 118.666,57.023 119.043,57.4 IC11.K9@119.048,57.4
  BottomLayer w0.16: v1(118.662,57.023) 118.662,57.015 119.035,56.642 120.361,56.642 121.501,55.502 121.521,55.502 121.728,55.295 R65.2@121.728,55.275
DDR3_DQ0: IC4.L13 IC11.E3 | length 24.2
  TopLayer w0.16: IC4.L13@101.998,54.95 v1(102.498,55.45) ; v1(122.597,53.276) 122.66,53.276 122.784,53.4 IC11.E3@123.848,53.4
  SignalLayer1 w0.26: v1(102.498,55.45) 103.111,54.838 103.737,54.838 104.975,53.6 104.975,53.127 105.132,52.97 114.453,52.97 114.723,52.7 117.548,52.7 117.924,52.324 119.761,52.324 120.822,53.385 122.452,53.385 122.561,53.276 v1(122.597,53.276)
DDR3_DQ1: IC4.L14 IC11.F7 | length 28.5
  TopLayer w0.16: IC4.L14@102.998,54.95 v1(103.498,55.45) ; v1@120.392,54.392 120.585,54.2 IC11.F7@120.648,54.2
  MidLayer2 w0.26: v1(103.498,55.45) 103.498,54.056 103.655,53.899 103.983,53.899 104.14,54.056 104.14,54.864 104.297,55.021 104.576,55.021 104.8,54.797 104.8,54.229 105.08,53.95 109.525,53.95 110.134,53.34 110.338,53.34 110.465,53.467 110.465,54.585 110.76,54.88 110.982,54.88 111.252,54.61 111.252,54.411 111.409,54.254 112.09,54.254 ; 112.116,54.243 114.015,54.243 114.475,54.243 cw(c114.475,53.963) 114.755,53.963 114.755,53.712 ccw(c115.035,53.712) 115.315,53.712 115.315,53.963 cw(c115.595,53.963) 115.595,54.243 115.725,54.243 115.943,54.243 116.357,53.828 116.357,52.125 116.514,51.968 117.445,51.968 117.602,52.125 117.602,54.079 118.432,54.909 119.814,54.909 v1@120.276,54.447
  other v1: 120.276,54.437
DDR3_DQ2: IC4.M16 IC11.F2 | length 26.4
  TopLayer w0.16: IC4.M16@104.998,53.95 v1(105.498,53.45) ; v1(121.673,51.4) 121.673,53.273 122.1,53.7 122.18,53.78 ccw(c121.963,53.997) 122.27,53.997 122.27,54.466 cw(c122.45,54.466) 122.63,54.466 122.63,53.989 ccw(c122.81,53.989) 122.81,53.809 123.225,53.809 124.257,53.809 IC11.F2@124.648,54.2
  BottomLayer w0.16: v1(105.498,53.45) 106.074,52.874 110.198,52.874 112.498,52.874 113.656,52.874 114.068,52.462 115.068,52.462 116.399,51.131 120.353,51.131 120.734,50.75 120.734,50.166 120.886,50.013 121.217,50.013 121.358,50.154 121.358,51.001 121.564,51.207 121.564,51.226 121.673,51.335 v1(121.673,51.4)
DDR3_DQ3: IC4.K16 IC11.F8 | length 25
  TopLayer w0.16: IC4.K16@104.998,55.95 v1(105.498,56.45) ; v1(119.482,54.47) 119.53,54.47 119.8,54.2 IC11.F8@119.848,54.2
  SignalLayer1 w0.26: v1(105.498,56.45) 105.973,55.975 105.973,55.4 106.088,55.285 106.088,55.28 106.328,55.04 106.333,55.04 106.423,54.95 108.673,54.95 109.073,54.55 109.447,54.55 110.197,55.3 110.568,55.3 111.328,54.54 111.668,54.54 111.953,54.825 113.426,54.825 114.016,54.825 cw(c114.016,54.565) 114.276,54.565 114.276,54.339 ccw(c114.506,54.339) 114.736,54.339 114.736,54.976 cw(c114.966,54.976) 115.196,54.976 115.196,53.975 ccw(c115.426,53.975) 115.656,53.975 115.656,55.285 cw(c115.886,55.285) 116.116,55.285 116.116,54.282 ccw(c116.346,54.282) 116.576,54.282 116.576,55.216 cw(c116.806,55.216) 117.036,55.216 117.036,54.47 ccw(c117.296,54.47) 117.296,54.21 117.902,54.21 118.033,54.079 118.084,54.079 119.127,54.079 119.48,54.432 v1@119.482,54.432
DDR3_DQ4: IC4.K14 IC11.H3 | length 24.2
  TopLayer w0.16: IC4.K14@102.998,55.95 v1(103.498,56.45) ; v1(123.448,55.4) IC11.H3@123.848,55.8
  SignalLayer1 w0.26: v1(103.498,56.45) 104.063,55.885 104.643,55.885 105.076,55.452 105.076,55.293 105.508,54.86 106.022,54.86 106.991,53.89 110.225,53.89 110.815,53.89 cw(c110.815,53.63) 111.075,53.63 111.075,53.594 ccw(c111.305,53.594) 111.535,53.594 111.535,53.63 cw(c111.795,53.63) 111.795,53.89 112.4,53.89 114.019,53.89 114.651,53.259 120.052,53.259 120.564,53.772 121.59,53.772 123.152,55.334 123.346,55.334 123.412,55.4 v1(123.448,55.4)
DDR3_DQ5: IC4.L16 IC11.H8 | length 27.2
  TopLayer w0.16: IC4.L16@104.998,54.95 v1(105.498,55.45) ; v1(119.482,56.159) 119.485,56.159 119.844,55.8 IC11.H8@119.848,55.8
  MidLayer2 w0.26: v1(105.498,55.45) 105.523,55.425 105.523,55.017 105.68,54.86 105.897,54.86 106.391,54.365 106.613,54.365 107.229,54.982 107.451,54.982 107.852,54.581 108.074,54.581 108.088,54.596 ; 108.102,54.61 108.088,54.596 ; v1(119.482,56.159) 119.466,56.159 119.048,55.742 117.912,55.742 117.896,55.742 117.085,54.931 ccw(c117.268,54.747) 117.008,54.747 117.008,54.581 cw(c116.753,54.581) 116.753,54.326 cw(c116.753,54.581) 116.498,54.581 116.498,55.56 ccw(c116.243,55.56) 116.243,55.815 ccw(c116.243,55.56) 115.988,55.56 115.988,54.838 cw(c115.733,54.838) 115.733,54.583 cw(c115.733,54.838) 115.478,54.838 115.478,55.56 ccw(c115.223,55.56) 115.223,55.815 ccw(c115.223,55.56) 114.968,55.56 114.968,54.838 cw(c114.713,54.838) 114.713,54.583 cw(c114.713,54.838) 114.458,54.838 114.458,55.56 ccw(c114.203,55.56) 114.203,55.815 ccw(c114.203,55.56) 113.948,55.56 113.948,54.838 cw(c113.693,54.838) 113.693,54.583 cw(c113.693,54.838) 113.438,54.838 113.438,55.472 ccw(c113.183,55.472) 113.183,55.727 ccw(c113.183,55.472) 112.928,55.472 112.928,55.2 cw(c112.668,55.2) 112.668,54.94 112.538,54.94 112.314,54.94 111.755,55.499 110.592,55.499 109.525,54.432 109.245,54.432 109.068,54.61 109.068,55.22 108.814,55.474 108.509,55.474 108.229,55.194 108.229,54.761 108.088,54.62 108.088,54.596
DDR3_DQ6: IC4.M15 IC11.G2 | length 27.8
  TopLayer w0.16: IC4.M15@103.998,53.95 v1(104.498,53.45) ; v1(124.251,55.385) 124.263,55.385 IC11.G2@124.648,55
  MidLayer2 w0.26: v1(104.498,53.45) 104.998,52.95 106.748,52.95 107.088,52.61 107.088,52.28 107.328,52.04 108.328,52.04 108.418,51.95 114.65,51.95 118.365,48.235 119.61,48.235 122.425,51.05 ; 122.424,51.051 123.848,52.475 123.848,53.225 124.251,53.628 v1(124.251,55.385)
DDR3_DQ7: IC4.L15 IC11.H7 | length 28.5
  TopLayer w0.16: IC4.L15@103.998,54.95 v1(104.498,55.45) ; v1(120.218,56.232) IC11.H7@120.648,55.801
  MidLayer2 w0.26: v1(104.498,55.45) 104.473,55.475 104.062,55.475 103.677,55.86 102.712,55.86 102.464,56.109 102.464,56.744 102.946,57.226 102.946,57.607 103.353,58.014 103.805,58.014 103.962,57.857 103.962,56.363 104.343,55.982 104.8,55.982 105.029,56.21 105.029,57.81 105.207,57.988 105.689,57.988 105.918,57.76 105.918,56.107 106.075,55.95 110.198,55.95 112.498,55.95 112.671,55.95 112.931,56.21 118.008,56.21 118.411,56.613 119.806,56.613 120.187,56.232 v1(120.218,56.232)
DDR3_DQ8: IC4.M20 IC11.D7 | length 23
  TopLayer w0.16: v1(108.509,53.38) 108.509,53.421 108.998,53.91 IC4.M20@108.998,53.95 ; IC11.D7@120.648,52.6 120.25,52.998 120.25,53.6 120.475,53.825 120.8,53.825 121.05,54.075 121.05,55.7 121.271,55.921 121.379,55.921 121.6,55.7 121.6,55.183 121.523,55.106 v1(121.523,54.525)
  MidLayer2 w0.26: v1(108.509,53.38) 108.534,53.355 108.849,53.355 109.296,52.908 111.252,52.908 112.243,53.899 113.157,53.899 114.173,52.883 114.96,52.883 116.408,51.435 117.526,51.435 118.085,51.994 118.085,53.081 118.242,53.238 118.919,53.238 118.923,53.242 120.24,53.242 121.488,54.49 v1@121.488,54.508
DDR3_DQ9: IC4.M18 IC11.C3 | length 21.5
  TopLayer w0.16: v1(106.498,53.45) IC4.M18@106.998,53.95 ; v1(122.946,52.798) 122.991,52.753 122.991,52.657 IC11.C3@123.848,51.8
  MidLayer2 w0.26: v1(106.498,53.45) 106.523,53.425 106.798,53.425 107.34,52.883 108.712,52.883 109.195,52.4 114.833,52.4 117.729,49.505 118.491,49.505 121.784,52.798 v1(122.946,52.798) v1@122.961,52.781
DDR3_DQ10: IC4.L18 IC11.C8 | length 24.3
  TopLayer w0.16: IC4.L18@106.998,54.95 v1(107.498,55.45) ; IC11.C8@119.848,51.8 119.908,51.8 120.185,52.077 v1(120.245,52.077)
  BottomLayer w0.16: 113.909,54.423 cw(c113.729,54.423) 113.602,54.296 113.548,54.35 112.665,54.35 111.198,54.35 111.023,54.525 109.748,54.525 109.451,54.822 108.315,54.822 107.95,54.458 107.801,54.458 107.703,54.555 107.703,54.693 108.204,55.194 108.204,55.318 108.106,55.416 107.968,55.416 107.645,55.093 107.514,55.093 107.417,54.995 107.417,53.953 107.319,53.855 107.181,53.855 107.036,54 107.036,55.726 107.218,55.908 107.356,55.908 ; 113.909,54.424 cw(c114.089,54.424) 114.269,54.424 114.269,53.982 ccw(c114.449,53.982) 114.629,53.982 114.629,54.424 cw(c114.809,54.424) 114.989,54.424 114.989,54.255 ccw(c115.169,54.255) 115.169,54.075 115.452,54.075 115.789,53.737 116.702,52.825 117.158,52.825 117.598,52.825 cw(c117.598,52.645) 117.778,52.645 117.778,52.113 ccw(c117.958,52.113) 118.138,52.113 118.138,52.169 cw(c118.318,52.169) 118.318,52.349 118.606,52.349 119.973,52.349 v1(120.245,52.077) ; 107.356,55.908 107.453,55.811 107.453,55.495 v1(107.498,55.45) 107.452,55.496 107.452,55.812 107.356,55.908